# Altium PCB PCB1.PcbDoc (part 1 of 2)
Units mil, origin at the board's own origin, x right, y up, seen from the top; angles counter-clockwise.
Board outline 3937.01 x 2559.06 mil, 4 copper layers (Top Layer, GND, 3V3, Bottom Layer), stack 23.756 mil thick; 182 components, 90 nets, 545 pads, 228 vias.
Unrouted connection lines stored in the file: 5.
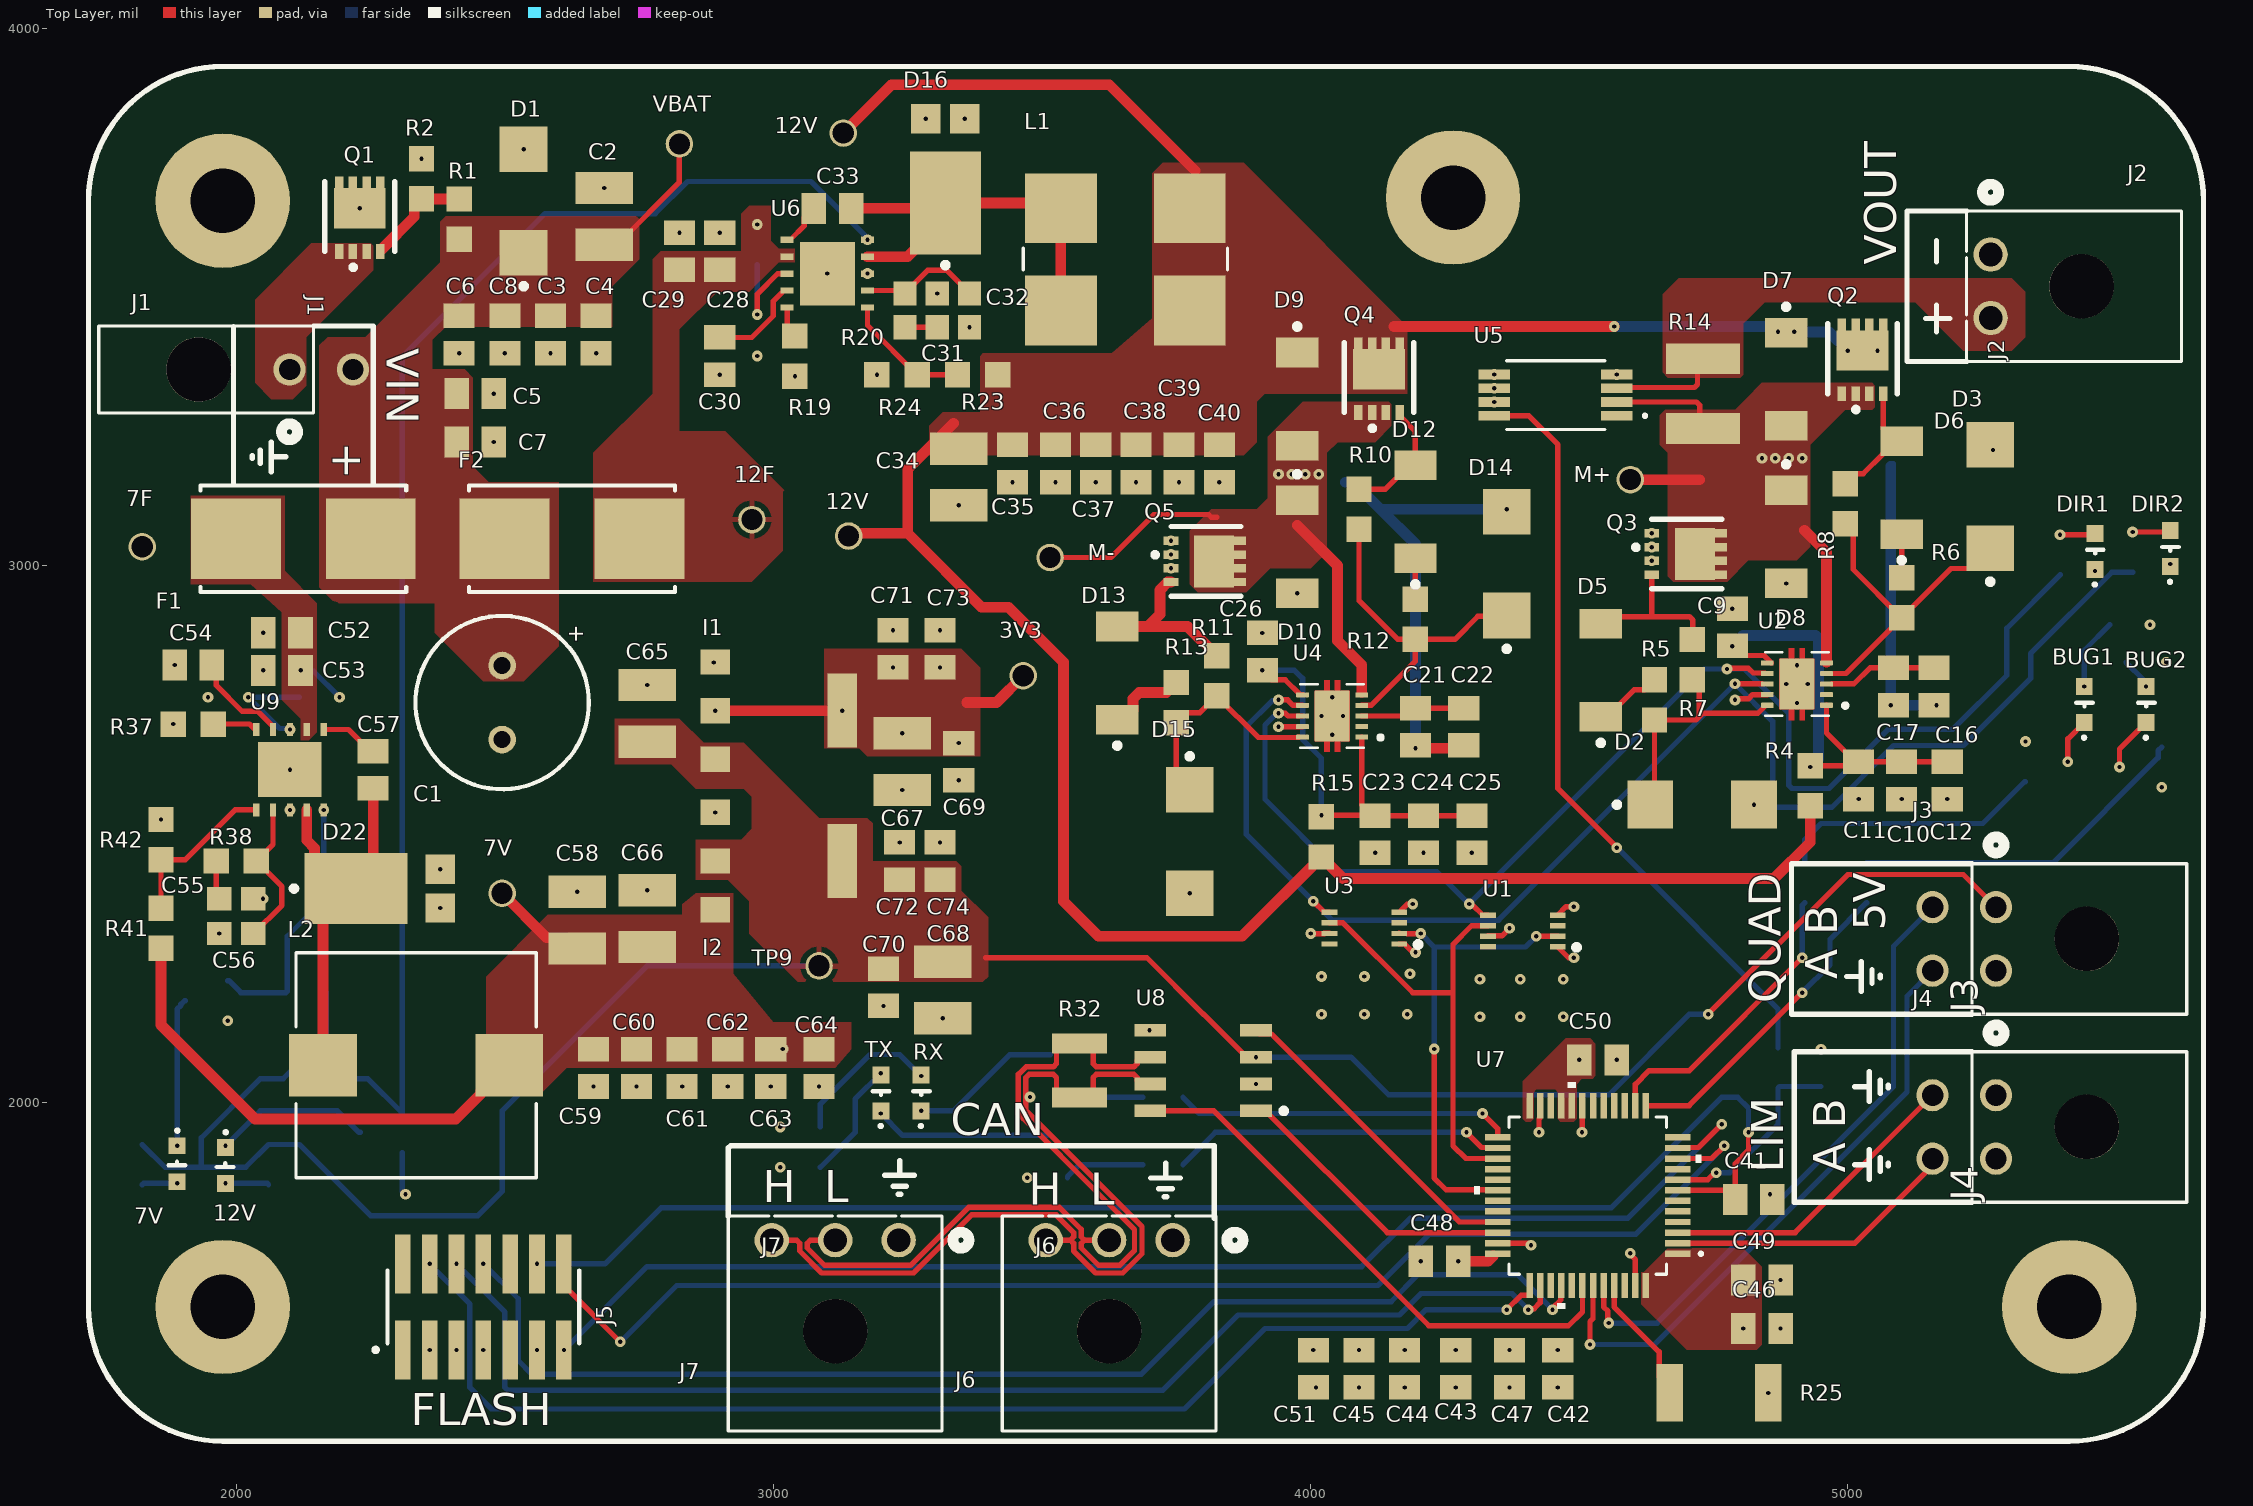
[diagram p0: Top Layer view]
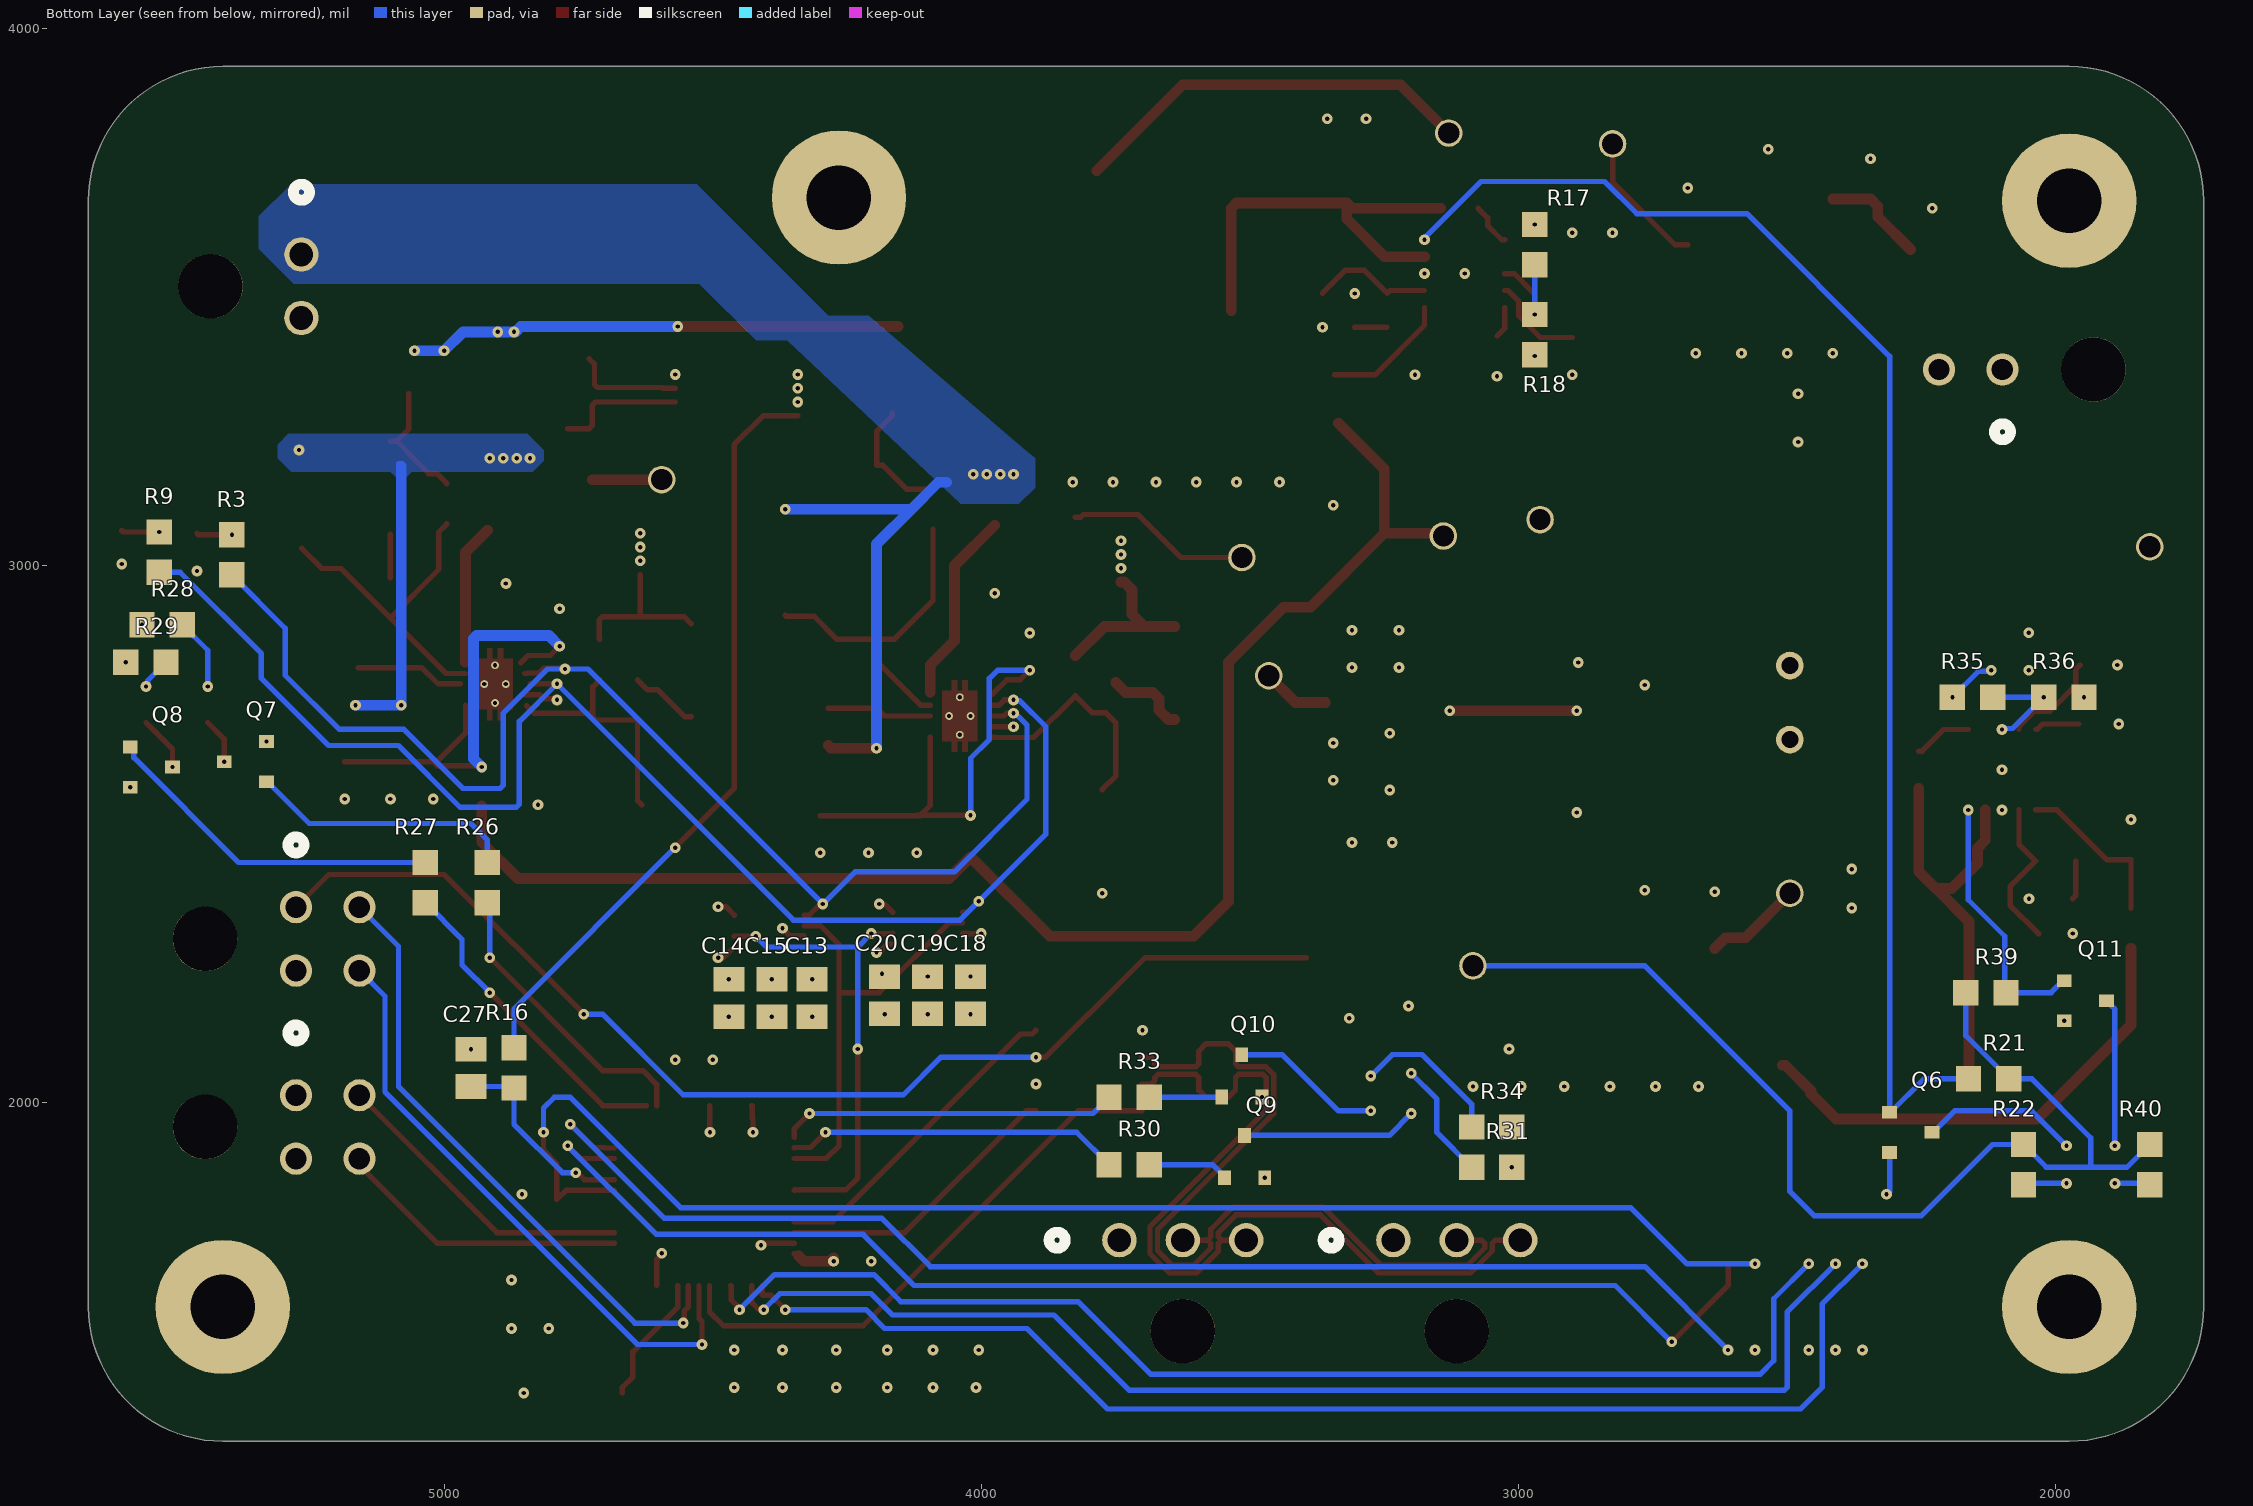
[diagram p1: Bottom Layer view, seen from below]
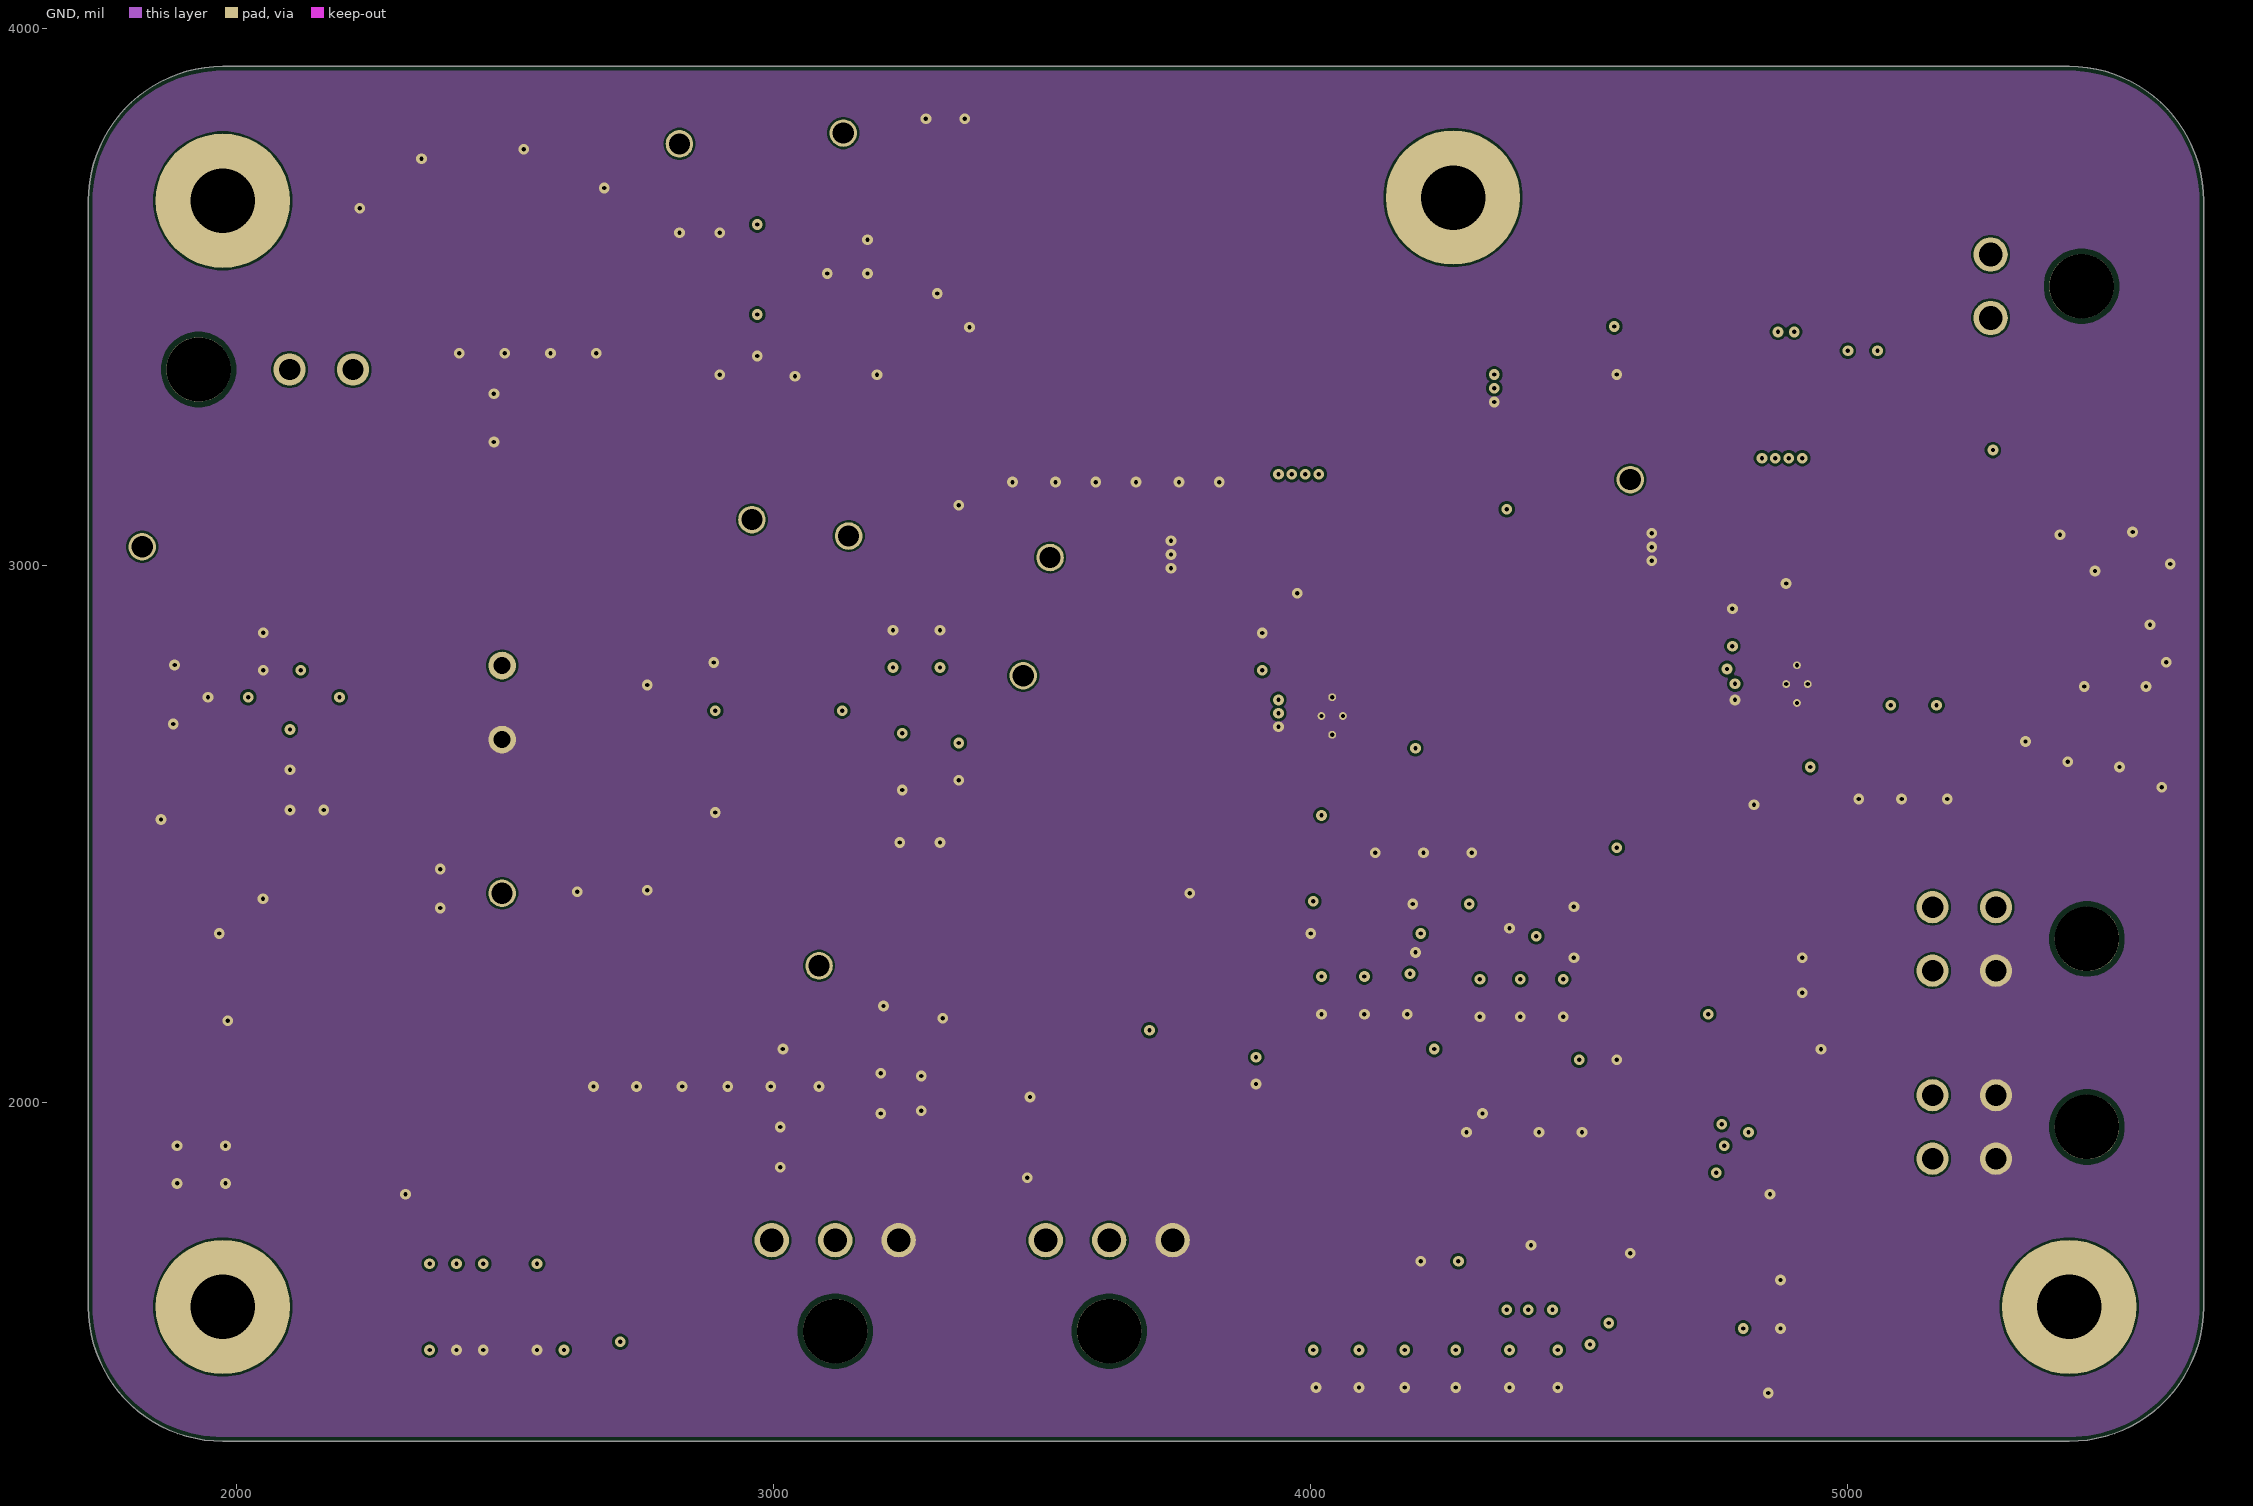
[diagram p2: GND]
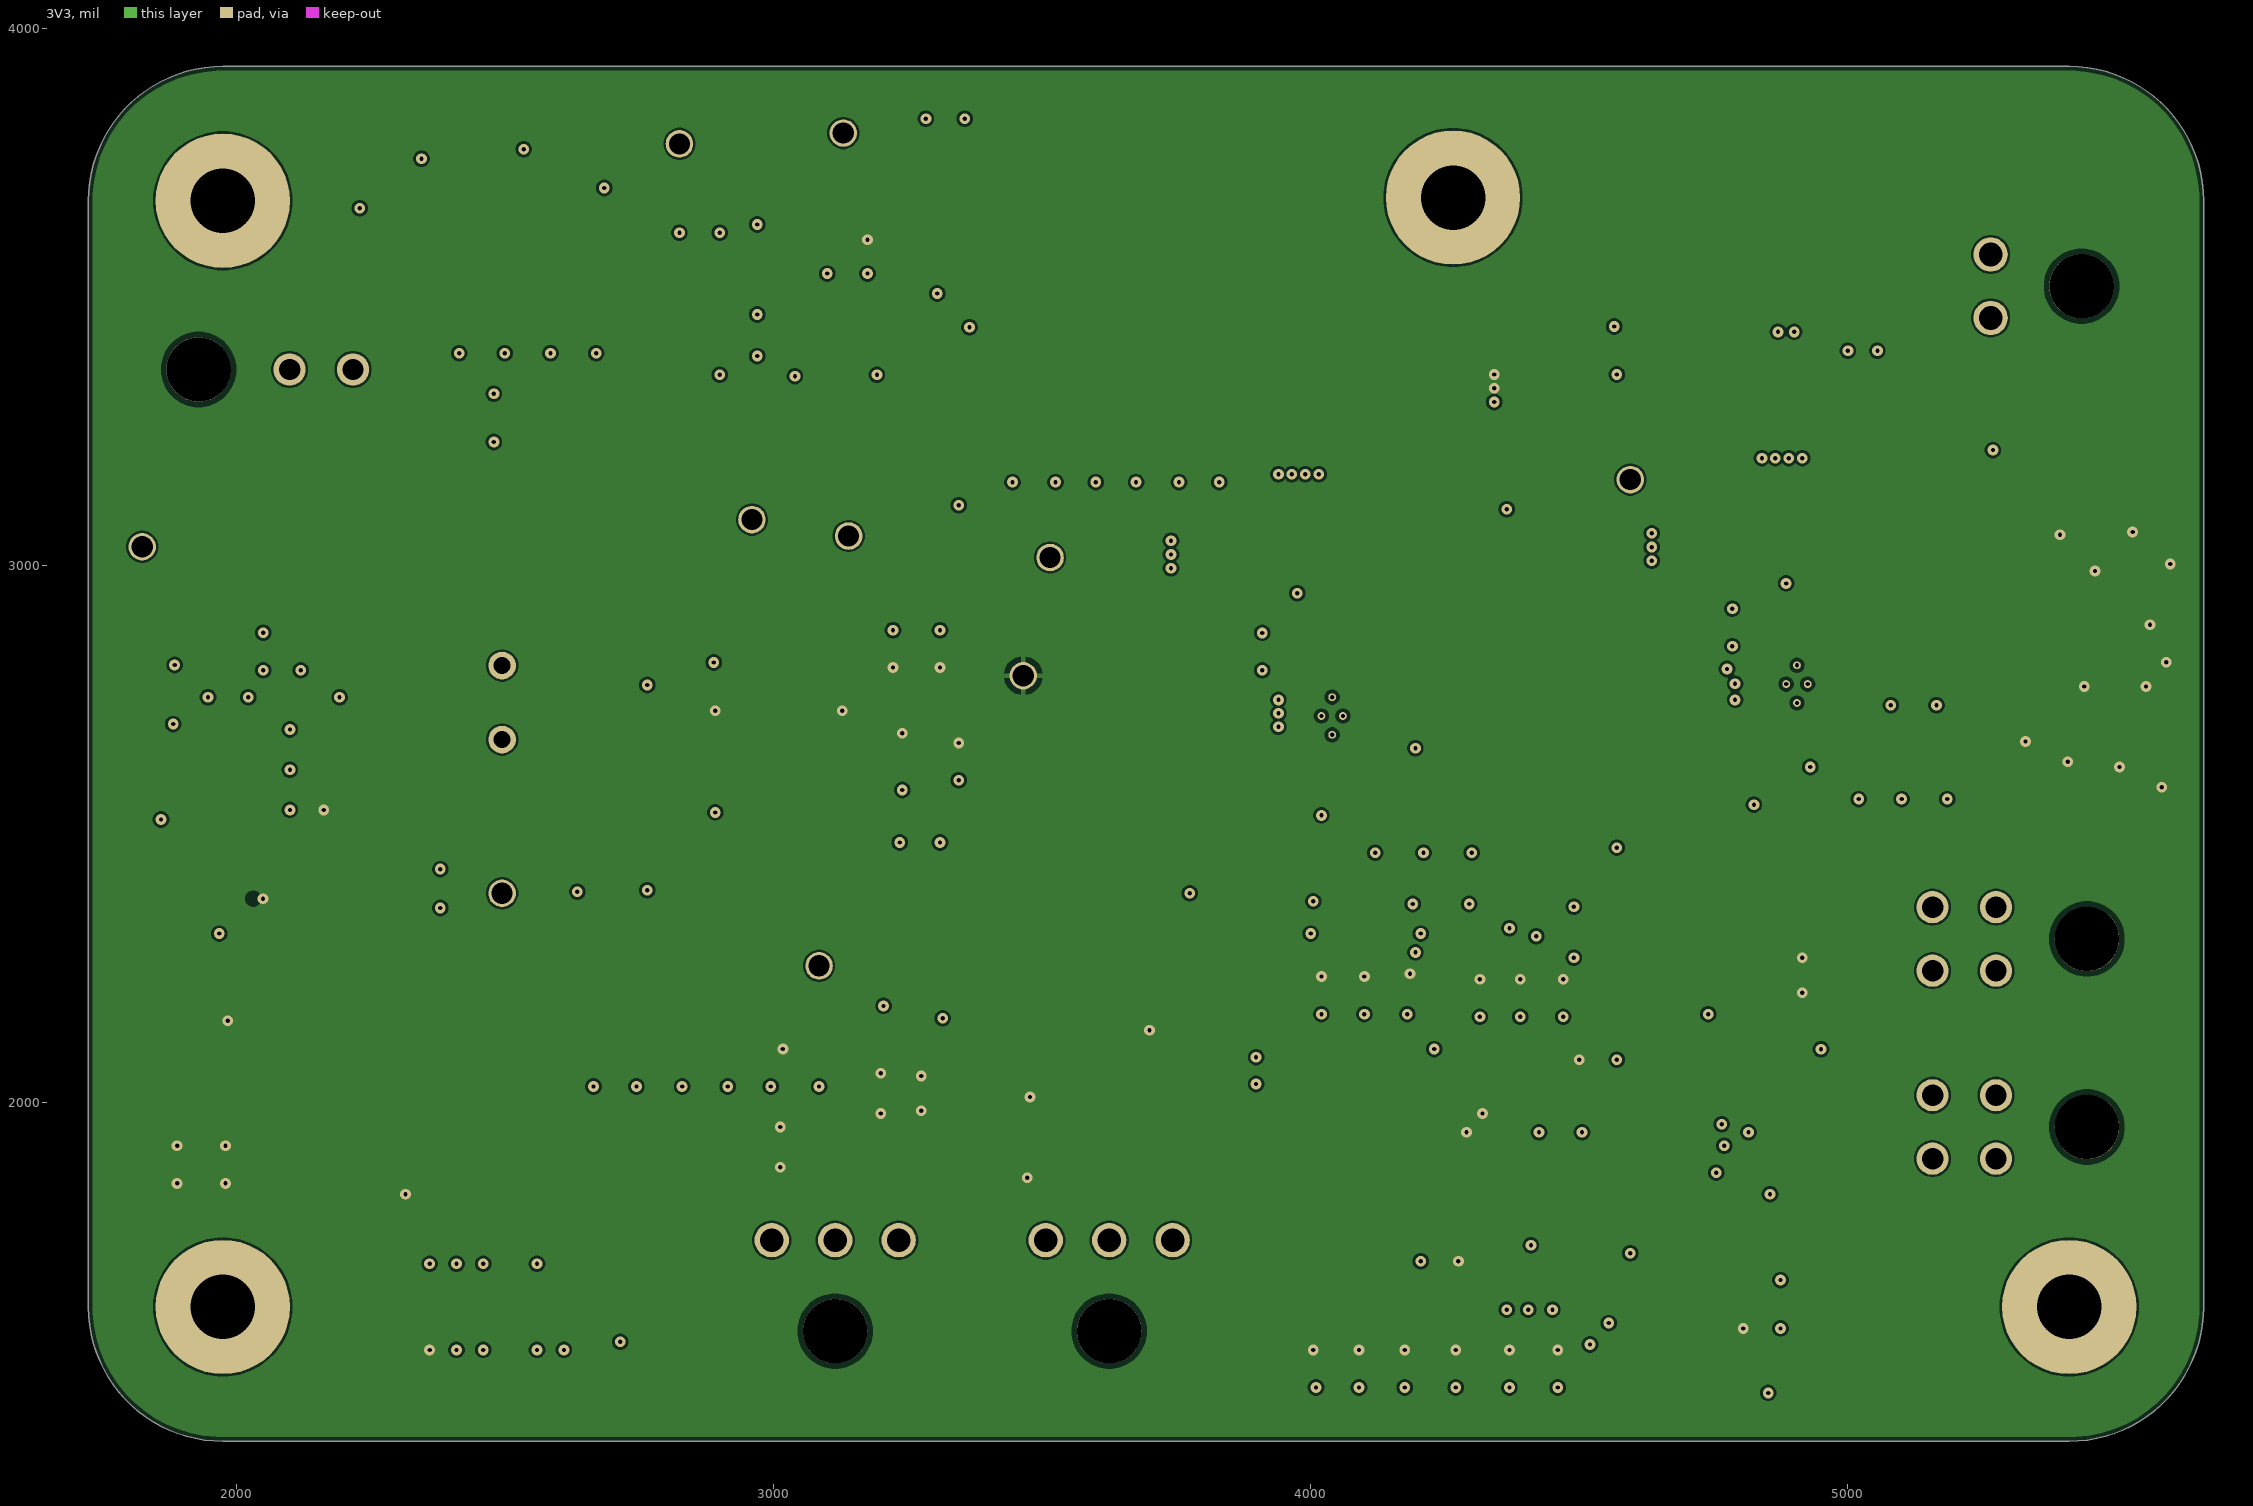
[diagram p3: 3V3]
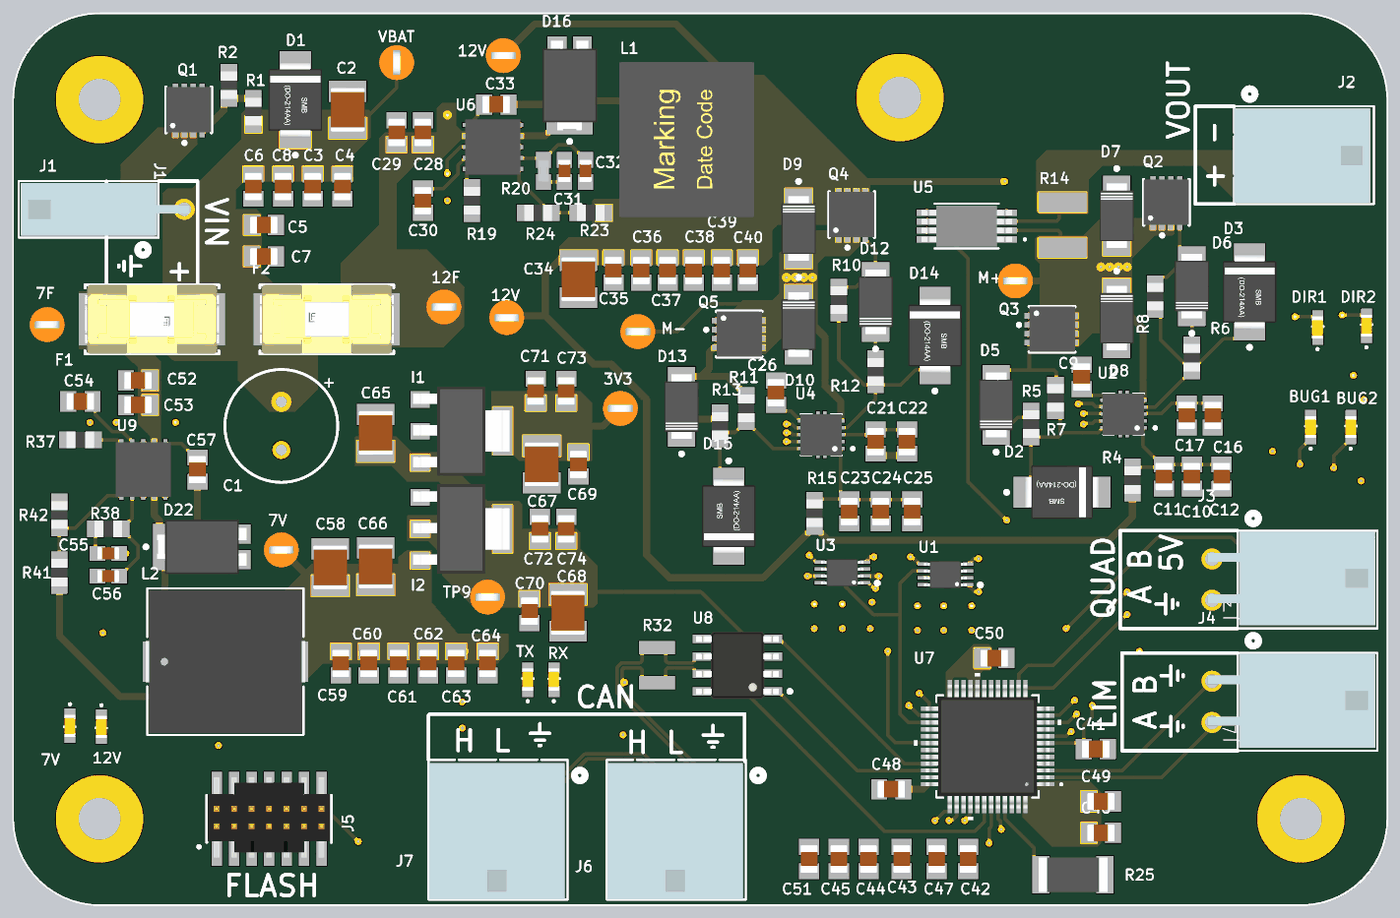
[diagram p5: 3D render of the assembled board from above, using the file's embedded part models]
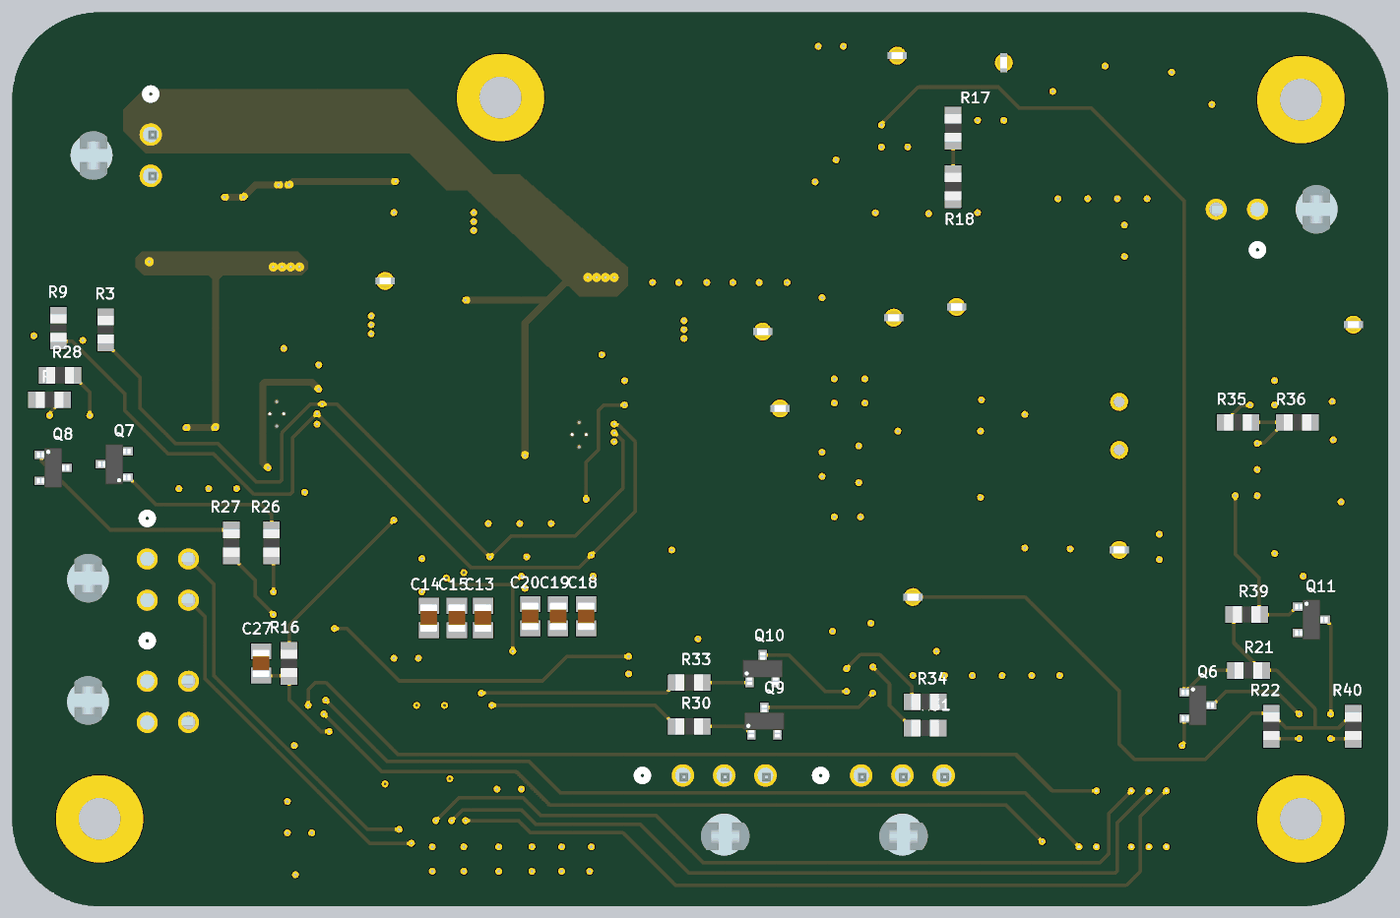
[diagram p6: 3D render of the assembled board from below, using the file's embedded part models]

## Layer stack, top to bottom
Top Solder: solder mask 0.4, Solder Resist, Dk 3.5
Top Layer: signal copper 1.4
Dielectric 2: prepreg 2.8, PP-006, Dk 4.1
GND: signal copper 1.378
Dielectric 1: dielectric 12.6, FR-4, Dk 4.8
3V3: signal copper 1.378
Dielectric 5: prepreg 2.8, PP-006, Dk 4.1
Bottom Layer: signal copper 1.4
Bottom Solder: solder mask 0.4, Solder Resist, Dk 3.5

## Board outline
1725,1620 1725,3679.06 cw(c1975,3679.06) 1975,3929.06 5412.01,3929.06 cw(c5412.01,3679.06) 5662.01,3679.06 5662.01,1620 cw(c5412.01,1620) 5412.01,1370 1975,1370 cw(c1975,1620)

## Design rules (kind name [scope] priority, off if disabled: settings)
BoardOutlineClearance [All] p1: gap=7.87 ignorepadtopadclearanceinfootprint=FALSE
Clearance [All] p1: gap=4 ignorepadtopadclearanceinfootprint=FALSE except(5: Arc-Via Track-Via SMDPad-Via THPad-Via Via-Via Via-Fill Via-Poly Via-Region Via-Text; 9.84: Arc-Hole Track-Hole SMDPad-Hole THPad-Hole Via-Hole Fill-Hole Poly-Hole Region-Hole Text-Hole)
ComponentClearance [All] p1: gap=4 collisioncheckmode=3 verticalgap=4 showdistances=TRUE
DiffPairsRouting [All] p1: maxlimit=4 minlimit=4 mostfreqgap=4 toplayer_minwidth=4 toplayer_maxwidth=71497.94 toplayer_prefwidth=4 midlayer1_minwidth=4 midlayer1_maxwidth=71497.94 midlayer1_prefwidth=4 midlayer2_minwidth=4 midlayer2_maxwidth=71497.94 midlayer2_prefwidth=4 bottomlayer_minwidth=4 bottomlayer_maxwidth=71497.94 bottomlayer_prefwidth=4 maxuncoupledlength=500
Height [All] p1: minheight=0 maxheight=71497.94 prefheight=500
HoleSize [All] p1: absolutevalues=TRUE maxlimit=248.03 minlimit=7.87 maxpercent=80.000 minpercent=20.000
HoleToHoleClearance [All] p1: gap=9.84 allowstackedmicrovias=FALSE
MinimumAnnularRing [All] p1: minimumring=3
MinimumSolderMaskSliver [All] p1: minsoldermaskwidth=0
PlaneClearance [All] p1: clearance=4
PlaneConnect PlaneConnectPowerPads [InPadClass('PowerPads')] p1: planeconnectstyle=Direct reliefexpansion=20 reliefentries=4 reliefconductorwidth=10 reliefairgap=10
PlaneConnect [All] p2: pad.planeconnectstyle=Relief pad.reliefexpansion=11.81 pad.reliefentries=4 pad.reliefconductorwidth=4 pad.reliefairgap=4 via.planeconnectstyle=Direct via.reliefexpansion=11.81 via.reliefentries=4 via.reliefconductorwidth=5 via.reliefairgap=5
PolygonConnect PolygonConnectPowerPads [All vs (InPadClass('PowerPads'))] p1: connectstyle=Direct reliefconductorwidth=10 reliefentries=4 polygonreliefangle="90 Angle" airgapwidth=10
PolygonConnect [All] p2: connectstyle=Direct reliefconductorwidth=4 reliefentries=4 polygonreliefangle="90 Angle" airgapwidth=4
RoutingVias [All] p1: holewidth=7.87 width=17.72 viastyle="Through Hole" minholewidth=7.87 minwidth=17.72 maxholewidth=248.03 maxwidth=257.87
SilkToSilkClearance [All] p1: silktosilkclearance=0
SilkToSolderMaskClearance [IsPad] p1: minsilkscreentomaskgap=4 clearancetoexposedcopper=TRUE
SolderMaskExpansion [All] p1: expansion=2.95 istentingtop=FALSE
SupplyNets "Schematic Supply Nets_10" [InNet('VDD')] p1: voltage=0.000
SupplyNets "Schematic Supply Nets_9" [InNet('VBAT_FUSED_12')] p2: voltage=0.000
SupplyNets "Schematic Supply Nets_8" [InNet('M+_beforeCURR')] p3: voltage=0.000
SupplyNets "Schematic Supply Nets_7" [InNet('VBAT_FUSED_7')] p4: voltage=0.000
SupplyNets "Schematic Supply Nets_6" [InNet('7V')] p5: voltage=0.000
SupplyNets "Schematic Supply Nets_5" [InNet('12V')] p6: voltage=0.000
SupplyNets "Schematic Supply Nets_3" [InNet('5V')] p7: voltage=0.000
SupplyNets "Schematic Supply Nets_2" [InNet('VBAT')] p8: voltage=0.000
SupplyNets "Schematic Supply Nets_1" [InNet('GND')] p9: voltage=0.000
SupplyNets "Schematic Supply Nets" [InNet('M+')] p10: voltage=0.000
Width [All] p1: maxlimit=71497.94 minlimit=4 preferedwidth=4
20 further rules are at their usual default settings.

## Classes and differential pairs
component class "Motor Control": 12V C9 C10 C11 C12 C13 C14 C15 C16 C17 C18 C19 C20 C21 C22 C23 C24 C25 C26 C27 D2 D3 D5 D6 D7 D8 D9 D10 D12 D13 D14 D15 DIR1 DIR2 J2 M+ M- Q2 Q3 Q4 Q5 R3 R4 R5 R6 R7 R8 R9 R10 R11 R12 R13 R14 R15 R16 U1 U2 U3 U4 U5
component class MCU: BUG1 BUG2 C41 C42 C43 C44 C45 C46 C47 C48 C49 C50 C51 J3 J4 J5 Q7 Q8 R25 R26 R27 R28 R29 U7
component class LDOs: 3V3 C65 C66 C67 C68 C69 C70 C71 C72 C73 C74 I1 I2 TP9
component class "Input Power": 7F 12F BUG1 C1 C2 C3 C4 C5 C6 C7 C8 F1 F2 J1 Q1 R1 R2 VBAT
component class CAN: J6 J7 Q9 Q10 R30 R31 R32 R33 R34 RX TX U8
component class "12V Buck": 12V C28 C29 C30 C31 C32 C33 C34 C35 C36 C37 C38 C39 C40 D16 L1 Q6 R17 R18 R19 R20 R21 R22 R23 R24 U6
component class "7V Buck": 7V C52 C53 C54 C55 C56 C57 C58 C59 C60 C61 C62 C63 C64 D22 L2 Q11 R35 R36 R37 R38 R39 R40 R41 R42 U9
differential pair CAN: +CAN_H -CAN_L

## Components (designator, comment, footprint, x,y, rotation, side; value= is the part's Value field where it differs from the comment)
3V3 "5003" TEST-POINT-0001 3465,2795 r0 top (schematic designator TP8)
7F "5003" TEST-POINT-0001 1825,3035 r0 top (schematic designator TP3)
7V "BL-HKC36G-AV-TRB" LED-0603 1860.42,1943.19 r270 top (schematic designator D23)
7V "5003" TEST-POINT-0001 2495,2390 r0 top (schematic designator TP7)
12F "5003" TEST-POINT-0001 2960,3085.51 r0 top (schematic designator TP2)
12V "BL-HKC36G-AV-TRB" LED-0603 1950.42,1940.19 r270 top (schematic designator D17)
12V "5003" TEST-POINT-0001 3140,3055 r0 top (schematic designator TP6)
12V "5003" TEST-POINT-0001 3130,3805 r0 top (schematic designator TP4)
BUG1 "BL-HKC36G-AV-TRB" LED-0603 5469.57,2684.8 r90 top (schematic designator D18)
BUG2 "BL-HKC36G-AV-TRB" LED-0603 5584.57,2684.8 r90 top (schematic designator D19)
C1 "CAP THRU" WCAP-ATUL_8X11.5(DXL) 2495,2745 r270 top value=100uF
C2 "CL32B106KMVNNWE" CAP-1210 2685,3650 r270 top
C3 "CC0805JKX7R9BB105" CAP-0805 2585,3430 r90 top
C4 "CL21B104KBCNNNC" CAP-0805 2670,3430 r90 top
C5 "C0805C103K5RACTU" CAP-0805 2445,3320 r180 top
C6 "CL21B102KBANNNC" CAP-0805 2415,3430 r90 top
C7 "CL21C101JBANNNC" CAP-0805 2445,3230 r180 top
C8 "CL21C100CBANNNC" CAP-0805 2500,3430 r90 top
C9 "CL21B102KBANNNC" CAP-0805 4785,2885 r270 top
C10 "CC0805JKX7R9BB105" CAP-0805 5100,2600 r270 top
C11 "C0805C103K5RACTU" CAP-0805 5020,2600 r270 top
C12 "CL21B102KBANNNC" CAP-0805 5185,2600 r270 top
C13 "CC0805JKX7R9BB105" CAP-0805 4315,2195 r270 bottom
C14 "CL21B104KBCNNNC" CAP-0805 4470,2195 r270 bottom
C15 "CL21B102KBANNNC" CAP-0805 4390,2195 r270 bottom
C16 "CL21B102KBANNNC" CAP-0805 5160,2775 r270 top
C17 "CL21B104KBCNNNC" CAP-0805 5085,2775 r270 top
C18 "CC0805JKX7R9BB105" CAP-0805 4020,2200 r270 bottom
C19 "CL21B104KBCNNNC" CAP-0805 4100,2200 r270 bottom
C20 "CL21B102KBANNNC" CAP-0805 4180,2200 r270 bottom
C21 "CL21B104KBCNNNC" CAP-0805 4195,2700 r270 top
C22 "CL21B102KBANNNC" CAP-0805 4285,2700 r270 top
C23 "CL21B102KBANNNC" CAP-0805 4120,2500 r270 top
C24 "C0805C103K5RACTU" CAP-0805 4210,2500 r270 top
C25 "CC0805JKX7R9BB105" CAP-0805 4300,2500 r270 top
C26 "CL21B102KBANNNC" CAP-0805 3910,2840 r270 top
C27 "CL21B102KBANNNC" CAP-0805 4950,2065 r270 bottom
C28 "CL21A225KBFNNNE" CAP-0805 2900,3585 r270 top
C29 "CL21A225KBFNNNE" CAP-0805 2825,3585 r270 top
C30 "CAP 0805" CAP-0805 2900,3390 r90 top
C31 "GRM1885C1H511JA01D" CAP-0603 3305,3475 r270 top
C32 "CL10C6R8CB8NNNC" CAP-0603 3365,3475 r90 top
C33 "CL21B104KBCNNNC" CAP-0805 3110,3665 r180 top
C34 "CL32B106KMVNNWE" CAP-1210 3345,3165 r90 top
C35 "CC0805JKX7R9BB105" CAP-0805 3445,3190 r90 top
C36 "CL21B104KBCNNNC" CAP-0805 3525,3190 r90 top
C37 "C0805C103K5RACTU" CAP-0805 3600,3190 r90 top
C38 "CL21B102KBANNNC" CAP-0805 3675,3190 r90 top
C39 "CL21C101JBANNNC" CAP-0805 3755,3190 r90 top
C40 "CL21C100CBANNNC" CAP-0805 3830,3190 r90 top
C41 "CL21B104KBCNNNC" CAP-0805 4825,1820 r0 top
C42 "CL21B104KBCNNNC" CAP-0805 4460,1505 r90 top
C43 "CAP 0805" CAP-0805 4270,1505 r90 top
C44 "TMK212AB7475KG-T" CAP-0805 4175,1505 r90 top
C45 "CC0805JKX7R9BB105" CAP-0805 4090,1505 r90 top
C46 "CL21B104KBCNNNC" CAP-0805 4840,1580 r180 top
C47 "CC0805JKX7R9BB105" CAP-0805 4370,1505 r90 top
C48 "CL21B104KBCNNNC" CAP-0805 4240,1705 r0 top
C49 "CL21B104KBCNNNC" CAP-0805 4840,1670 r180 top
C50 "CL21B104KBCNNNC" CAP-0805 4535,2080 r180 top
C51 "TMK212AB7475KG-T" CAP-0805 4005,1505 r90 top
C52 "CAP 0805" CAP-0805 2085,2875 r0 top
C53 "CAP 0805" CAP-0805 2085,2805 r0 top
C54 "CAP 0805" CAP-0805 1920,2815 r0 top
C55 "GCM1885C1H302FA16J" CAP-0603 2000,2380 r180 top
C56 "CL10C6R8CB8NNNC" CAP-0603 2000,2315 r0 top
C57 "CL21B104KBCNNNC" CAP-0805 2255,2620 r90 top
C58 "CL32B106KMVNNWE" CAP-1210 2635,2340 r270 top
C59 "CC0805JKX7R9BB105" CAP-0805 2665,2065 r90 top
C60 "CL21B104KBCNNNC" CAP-0805 2745,2065 r90 top
C61 "C0805C103K5RACTU" CAP-0805 2830,2065 r90 top
C62 "CL21B102KBANNNC" CAP-0805 2915,2065 r90 top
C63 "CL21C101JBANNNC" CAP-0805 2995,2065 r90 top
C64 "CL21C100CBANNNC" CAP-0805 3085,2065 r90 top
C65 "CL32B106KMVNNWE" CAP-1210 2765,2725 r270 top
C66 "CL32B106KMVNNWE" CAP-1210 2765,2342.8 r270 top
C67 "CL32B106KMVNNWE" CAP-1210 3240,2635 r90 top
C68 "CL32B106KMVNNWE" CAP-1210 3315,2210 r90 top
C69 "CL21B104KBCNNNC" CAP-0805 3345,2635 r90 top
C70 "CL21B104KBCNNNC" CAP-0805 3205,2215 r90 top
C71 "C0805C471K5RACTU" CAP-0805 3222.5,2845 r270 top
C72 "C0805C471K5RACTU" CAP-0805 3235,2450 r270 top
C73 "CC0805JKX7R9BB105" CAP-0805 3310,2845 r270 top
C74 "CC0805JKX7R9BB105" CAP-0805 3310,2450 r270 top
D1 "SMBJ40CA" "DO-214AA (SMBJ)" 2535,3680 r270 top
D2 "SMBJ40CA" "DO-214AA (SMBJ)" 4730,2555 r180 top
D3 "SMBJ40CA" "DO-214AA (SMBJ)" 5265,3130 r270 top
D5 "PMEG6030EP,115" DIO-SOD128 4540,2805 r0 top
D6 "PMEG6030EP,115" DIO-SOD128 5100,3145 r0 top
D7 "PMEG6030EP,115" DIO-SOD128 4885,3346.61 r180 top
D8 "PMEG6030EP,115" DIO-SOD128 4885,3053.39 r180 top
D9 "PMEG6030EP,115" DIO-SOD128 3975,3310 r180 top
D10 "PMEG6030EP,115" DIO-SOD128 3975,3035 r180 top
D12 "PMEG6030EP,115" DIO-SOD128 4195,3100 r0 top
D13 "PMEG6030EP,115" DIO-SOD128 3640,2800 r0 top
D14 "SMBJ40CA" "DO-214AA (SMBJ)" 4365,3005 r270 top
D15 "SMBJ40CA" "DO-214AA (SMBJ)" 3775,2485 r90 top
D16 "PDS760-13" DO-POWERDI5 3320,3719.33 r270 top
D22 "PDS760-13" DO-POWERDI5 2267.56,2398.78 r180 top
DIR1 "BL-HKC36G-AV-TRB" LED-0603 5489.57,2969.8 r90 top (schematic designator D4)
DIR2 "BL-HKC36G-AV-TRB" LED-0603 5629.57,2974.8 r90 top (schematic designator D11)
F1 "01550900M" FUSE-0001 2125,3050 r180 top
F2 "01550900M" FUSE-0001 2625,3050 r0 top
I1 "LM1117IMPX-3.3/NOPB" IC-SOT-223-4 3010,2730 r0 top
I2 "LM1117MPX-5.0/NOPB" IC-SOT-223-4 3010,2450 r0 top
J1 "2125280200" CONN_2125280000_02_MOL 2099.29,3365 r270 top
J2 "2157602002" CONN_2157600003-SD_02_PEG_MOL 5265.71,3579.06 r90 top
J3 "2125280400" CONN_2125280000_04_MOL 5275.71,2364.06 r90 top
J4 "2125280400" CONN_2125280000_04_MOL 5275.71,2014.06 r90 top
J5 "FTSH-107-01-L-DV-K" SAMTEC_FTSH-107-01-L-DV-K 2460,1620.12 r0 top
J6 "2157601003" CONN_2157600003-SD_03_PEG_MOL 3743.11,1744.29 r0 top
J7 "2157601003" CONN_2157600003-SD_03_PEG_MOL 3233.11,1744.29 r0 top
L1 "CSAD1010-150M" IND-15U-0002 3835,3350 r90 top
L2 "BMRF001010401R0MD1" IND-10UH-0001 2335,2070 r0 top
M+ "5003" TEST-POINT-0001 4595,3160 r0 top (schematic designator M+1)
M- "5003" TEST-POINT-0001 3515,3015 r0 top (schematic designator M+2)
Q1 "CSD18543Q3AT" IC-8VSONCLIP 2157.68,3550.16 r0 top
Q2 "CSD17575Q3" IC-8VSONCLIP 4954.88,3285.47 r0 top
Q3 "CSD17575Q3" IC-8VSONCLIP 4600.47,3093.93 r270 top
Q4 "CSD17575Q3" IC-8VSONCLIP 4054.88,3250.47 r0 top
Q5 "CSD17575Q3" IC-8VSONCLIP 3705.47,3080.12 r270 top
Q6 "T2N7002AK,LM" IC-SOT23-3 2270,1945 r270 bottom
Q7 "T2N7002AK,LM" IC-SOT23-3 5370,2635 r90 bottom
Q8 "T2N7002AK,LM" IC-SOT23-3 5545,2625 r270 bottom
Q9 "T2N7002AK,LM" IC-SOT23-3 3510,1900 r180 bottom
Q10 "T2N7002AK,LM" IC-SOT23-3 3515,2050 r180 bottom
Q11 "T2N7002AK,LM" IC-SOT23-3 1945,2190 r270 bottom
R1 "RC0805FR-07200KL" RES-0805 2415,3645 r90 top
R2 "ERA-6AEB104V" RES-0805 2345,3720 r90 top
R3 "RC0805FR-07100RL" RES-0805 5395,3020 r90 bottom
R4 "RMCF0805JT1R00" RES-0805 4930,2590 r270 top
R5 "RC0805FR-0733RL" RES-0805 4640,2750 r90 top
R6 "RC0805FR-0733RL" RES-0805 5100,2940 r90 top
R7 "RC0805FR-0733RL" RES-0805 4710,2825 r90 top
R8 "RC0805FR-0733RL" RES-0805 4995,3115 r90 top
R9 "RC0805FR-07100RL" RES-0805 5530,3025 r90 bottom
R10 "RC0805FR-0733RL" RES-0805 4090,3105 r90 top
R11 "RC0805FR-0733RL" RES-0805 3825,2795 r90 top
R12 "RC0805FR-0733RL" RES-0805 4195,2900 r90 top
R13 "RC0805FR-0733RL" RES-0805 3750,2745 r90 top
R14 "RES 2512" RES-2512 4730,3320 r90 top
R15 "RMCF0805JT1R00" RES-0805 4020,2495 r270 top
R16 "RC0805FR-07100RL" RES-0805 4870,2065 r270 bottom
R17 "CRCW08052M15FKEA" RES-0805 2970,3597.6 r90 bottom
R18 "ERA-6AEB104V" RES-0805 2970,3430 r90 bottom
R19 "RC0805FR-07178KL" RES-0805 3040,3390 r90 top
R20 "RC0603FR-0759KL" RES-0603 3245,3475 r90 top
R21 "CRCW08051K00FKEA" RES-0805 2125,2045 r180 bottom
R22 "ERJ-6GEYJ241V" RES-0805 2060,1885 r90 bottom
R23 "RC0805FR-07147KL" RES-0805 3380,3355 r0 top
R24 "RC0805FR-0710K5L" RES-0805 3230,3355 r0 top
R25 "CRF2010-J/-000ELF" RES-2010 4760,1460 r180 top
R26 "CRGCQ0805J470R" RES-0805 4920,2410 r90 bottom
R27 "CRGCQ0805J470R" RES-0805 5035,2410 r90 bottom
R28 "RC0805FR-07100RL" RES-0805 5525,2890 r0 bottom
R29 "RC0805FR-07100RL" RES-0805 5555,2820 r0 bottom
R30 "CRGCQ0805J470R" RES-0805 3725,1885 r180 bottom
R31 "RC0805FR-07100RL" RES-0805 3050,1880 r180 bottom
R32 "RC1210FR-07120RL" RES-1210 3570,2060 r270 top
R33 "CRGCQ0805J470R" RES-0805 3725,2010 r180 bottom
R34 "RC0805FR-07100RL" RES-0805 3050,1955 r180 bottom
R35 "CRCW08052M15FKEA" RES-0805 2155,2755 r0 bottom
R36 "ERA-6AEB104V" RES-0805 1985,2755 r0 bottom
R37 "RC0805FR-07178KL" RES-0805 1920,2705 r0 top
R38 "RC0805FR-0736K5L" RES-0805 2000,2450 r0 top
R39 "CRCW08051K00FKEA" RES-0805 2130,2205 r0 bottom
R40 "ERJ-6GEYJ241V" RES-0805 1825,1885 r90 bottom
R41 "CRCW080580K6FKEA" RES-0805 1860,2325 r270 top
R42 "RT0805BRD0710K4L" RES-0805 1860,2490 r270 top
RX "BL-HKC36G-AV-TRB" LED-0603 3304.57,1961.81 r90 top (schematic designator D21)
TP9 "5003" TEST-POINT-0001 3085,2255 r0 top
TX "BL-HKC36G-AV-TRB" LED-0603 3229.57,1961.81 r90 top (schematic designator D20)
U1 "SN74LVC2G157DCUR" IC-8VSSOP 4459.92,2349.37 r180 top
U2 "UCC27282DRCR" IC-10VSON 4905.12,2779.37 r180 top
U3 "SN74LVC2G157DCUR" IC-8VSSOP 4165,2354.68 r180 top
U4 "UCC27282DRCR" IC-10VSON 4040,2720 r180 top
U5 "INA240A2PWR" PW0008A_L 4455.83,3317.2 r180 top
U6 "TPS54561DPRR" IC-10WSON 3100.2,3543.5 r0 top
U7 "STM32G431CBT6" IC-LQFP48 4515.79,1827.32 r180 top
U8 "TCAN1044VDRQ1" IC-8SOIC 3800,2060 r90 top
U9 "TPS54561DPRR" IC-10WSON 2100,2620 r270 top
VBAT "5003" TEST-POINT-0001 2825,3785 r90 top (schematic designator TP1)

## Footprints (in the part's own frame and the unit in brackets; to place one, negate y for a bottom-side part, rotate by r counter-clockwise, add the part's x,y. Pads: shape width x height; smd on the part's side, far side on the other; paste and mask are expansions set on the pad)
CAP-0603 [mm]
  rect 1.15x1.1 smd: 1(-0.8,0) 2(0.8,0)
  body extent -0.8,-0.45 0.8,0.45, height 0.8
CAP-0805 [mm]
  rect 1.16x1.47 smd: 1(-0.88,0) 2(0.88,0)
  body extent -1,-0.63 1,0.63, height 0.94
CAP-1210 [mm]
  rect 1.53x2.72 smd: 1(-1.341,0) 2(1.341,0)
  body extent -1.6,-1.25 1.6,1.25, height 2.7
CONN_2125280000_02_MOL [mil]
  round 60 hole 40 paste-99999 mask+0: 1(0,0) 2(0,118.11)
  round 120 hole 120 unplated paste-99999 mask+0: 3(0,-169.29)
  silkscreen extent -81,-355 131,45, body extent -76,-350 76,131, height 325
CONN_2125280000_04_MOL [mil]
  round 60 hole 40 paste-99999 mask+0: 1(0,0) 2(-118.11,0) 3(0,118.11) 4(-118.11,118.11)
  round 120 hole 120 unplated paste-99999 mask+0: 5(-59.06,-169.29)
  silkscreen extent -199,-355 131,45, body extent -190,-350 80,131, height 325
CONN_2157600003-SD_02_PEG_MOL [mil]
  round 64 hole 44 paste-99999 mask+0: 1(0,0) 2(-118.11,0)
  round 120 hole 120 unplated paste-99999 mask+0: 3(-59.06,-169.29)
  silkscreen extent -199,-355 131,45, body extent -195,-345 75,45, height 210
CONN_2157600003-SD_03_PEG_MOL [mil]
  round 64 hole 44 paste-99999 mask+0: 1(0,0) 2(-118.11,0) 3(-236.22,0)
  round 120 hole 120 unplated paste-99999 mask+0: 4(-118.11,-169.29)
  silkscreen extent -317,-355 131,45, body extent -315,-355 73,35, height 210
DIO-SOD128 [mm]
  rect 2x1.4 smd: 1(0,2.2) 2(0,-2.2)
  silkscreen extent -0.12,-3.55 0.13,-3.3, body extent -1.25,-2.35 1.25,2.35, height 1.05
"DO-214AA (SMBJ)" [mm]
  rect 2.16x2.26 smd: 1(-2.416,0) 2(2.484,0)
  silkscreen extent 3.94,-0.12 4.19,0.13, body extent -2.72,-1.95 2.78,1.95, height 2.45
DO-POWERDI5 [mm] "SMD, 3-Leads, Body 3.975x5.375mm, Pitch 1.84mm"
  rect 1.4x1.39 smd: 1(-2.856,-0.92) 1(-2.856,0.92)
  rect 4.86x3.36 smd: 2(1.126,0)
  silkscreen extent 3.94,-0.12 4.19,0.13, body extent -3.25,-1.98 3.25,1.98, height 1.15
FUSE-0001 [mil]
  rect 167x150 smd paste+0 mask+0: 1(-125.5,0) 2(125.5,0)
  silkscreen extent -192,-99 192,99, body extent -213,-103 213,103, height 10
IC-8SOIC [mm]
  rect 0.6x1.5 smd: 1(-1.905,-2.5) 2(-0.635,-2.5) 3(0.635,-2.5) 4(1.905,-2.5) 5(1.905,2.5) 6(0.635,2.5) 7(-0.635,2.5) 8(-1.905,2.5)
  silkscreen extent -2.03,-3.94 -1.78,-3.69, body extent -2.45,-3 2.45,3, height 1.75
IC-8VSONCLIP [mm]
  rect 0.4x0.7 smd paste-100 mask+0.05: 1(2.812,0.877) 2(0.862,0.877) 2(1.512,0.877) 2(2.162,0.877) 3(0.862,4.077) 3(1.512,4.077) 3(2.162,4.077) 3(2.812,4.077)
  rect 2.45x1.9 smd paste-100 mask+0.05: 3(1.837,2.917)
  silkscreen extent 0.19,0.03 3.49,4.18, body extent 0.18,0.89 3.48,4.19, height 1.1
IC-8VSSOP [mm]
  rect 0.75x0.25 smd: 1(0,1.5) 2(0,1) 3(0,0.5) 4(0,0) 5(3.3,0) 6(3.3,0.5) 7(3.3,1) 8(3.3,1.5)
  silkscreen extent -1.02,1.4 -0.76,1.65, body extent 0.1,-0.24 3.2,1.76, height 0.9
IC-10VSON [mm]
  rrect25% 0.6x0.24 smd mask+0: 1(-1.4,1) 2(-1.4,0.5) 3(-1.4,0) 4(-1.4,-0.5) 5(-1.4,-1) 6(1.4,-1) 7(1.4,-0.5) 8(1.4,0) 9(1.4,0.5) 10(1.4,1)
  round 0.368 hole 0.2 mask+0: 11(-0.508,0) 11(0,0.889) 11(0,-0.889) 11(0.508,0)
  rrect5% 1.65x2.4 smd paste-2 mask+0: 11(0,0)
  Top Layer region: 0.375,1.2 0.825,1.2 0.825,-1.2 0.375,-1.2 0.375,-1.7 0.125,-1.7 0.125,-1.2 -0.125,-1.2 -0.125,-1.7 -0.375,-1.7 -0.375,-1.2 -0.825,-1.2 -0.825,1.2 -0.375,1.2 -0.375,1.7 -0.125,1.7 -0.125,1.2 0.125,1.2 0.125,1.7 0.375,1.7
  silkscreen extent -2.39,-1.5 1.5,1.5, body extent -1.48,-1.48 1.52,1.52, height 1
IC-10WSON [mm]
  rect 0.6x0.3 smd: 1(-1.9,1.6) 2(-1.9,0.8) 3(-1.9,0) 4(-1.9,-0.8) 5(-1.9,-1.6) 6(1.9,-1.6) 7(1.9,-0.8) 8(1.9,0) 9(1.9,0.8) 10(1.9,1.6)
  rect 2.6x3 smd: 11(0,0)
  body extent -2,-2 2,2, height 0.8
IC-LQFP48 [mil]
  rect 47x12 smd paste+0 mask+0: 1(-167.32,108.27) 2(-167.32,88.58) 3(-167.32,68.9) 4(-167.32,49.21) 5(-167.32,29.53) 6(-167.32,9.84) 7(-167.32,-9.84) 8(-167.32,-29.53) 9(-167.32,-49.21) 10(-167.32,-68.9) 11(-167.32,-88.58) 12(-167.32,-108.27) 25(167.32,-108.27) 26(167.32,-88.58) 27(167.32,-68.9) 28(167.32,-49.21) 29(167.32,-29.53) 30(167.32,-9.84) 31(167.32,9.84) 32(167.32,29.53) 33(167.32,49.21) 34(167.32,68.9) 35(167.32,88.58) 36(167.32,108.27)
  rect 12x47 smd paste+0 mask+0: 13(-108.27,-167.32) 14(-88.58,-167.32) 15(-68.9,-167.32) 16(-49.21,-167.32) 17(-29.53,-167.32) 18(-9.84,-167.32) 19(9.84,-167.32) 20(29.53,-167.32) 21(49.21,-167.32) 22(68.9,-167.32) 23(88.58,-167.32) 24(108.27,-167.32) 37(108.27,167.32) 38(88.58,167.32) 39(68.9,167.32) 40(49.21,167.32) 41(29.53,167.32) 42(9.84,167.32) 43(-9.84,167.32) 44(-29.53,167.32) 45(-49.21,167.32) 46(-68.9,167.32) 47(-88.58,167.32) 48(-108.27,167.32)
  silkscreen extent -214,-211 211,211, body extent -177,-177 177,177, height 63
IC-SOT23-3 [mm]
  rect 0.6x0.7 smd: 1(-0.95,-1) 2(0.95,-1) 3(0,1)
  body extent -1.46,-1.18 1.46,1.18, height 1.12
IC-SOT-223-4 [mm]
  rect 1.4x1.2 smd mask+0.07: 1(-3,2.3) 3(-3,-2.3) 4(-3,0)
  rect 1.4x3.5 smd: 2(3,0)
  body extent -3.5,-3.25 3.5,3.25, height 1.68
IND-10UH-0001 [mil]
  rect 126x116 smd paste+0 mask+0: 1(-173.5,0) 2(173.5,0)
  silkscreen extent -224,-210 224,210, body extent -229,-204 229,204, height 157
IND-15U-0002 [mm] "12V Buck"
  rect 3.3x3.4 smd paste+0 mask+0: 1(3.175,7.62) 1(8.001,7.62) 2(3.175,1.524) 2(8.001,1.524)
  silkscreen extent 5.08,-0.25 6.11,9.4, body extent -0.19,-0.33 11.11,9.47, height 10.79
LED-0603 [mm]
  rect 0.8x0.8 smd: 1(2.291,0.751) 2(0.589,0.751)
  silkscreen extent -0.2,0.34 1.52,1.13, body extent 0.65,0.36 2.25,1.16, height 0.39
PW0008A_L [mil]
  rect 59x18 smd paste+0 mask+2: 1(-114.17,38.39) 2(-114.17,12.8) 3(-114.17,-12.8) 4(-114.17,-38.39) 5(114.17,-38.39) 6(114.17,-12.8) 7(114.17,12.8) 8(114.17,38.39)
  silkscreen extent -169,-64 92,64, body extent -130,-59 130,59, height 47
RES-0603 [mm]
  rect 1.15x1.1 smd: 1(-0.8,0) 2(0.8,0)
  body extent -0.8,-0.4 0.8,0.4, height 0.43
RES-0805 [mm]
  rect 1.2x1.2 smd: 1(-0.95,0) 2(0.95,0)
  body extent -1,-0.6 1,0.6, height 0.71
RES-1210 [mm] "Chip Resistor, 2-Leads, Body 3.10x2.60mm, IPC High Density"
  rect 0.95x2.6 smd: 1(-1.275,0) 2(1.275,0)
  body extent -1.6,-1.35 1.6,1.35, height 0.6
RES-2010 [mm]
  rect 1.26x2.72 smd: 1(-2.325,0) 2(2.325,0)
  body extent -2.5,-1.25 2.5,1.25, height 0.7
RES-2512 [mm]
  rect 1.45x3.5 smd: 1(-1.65,0) 2(1.65,0)
SAMTEC_FTSH-107-01-L-DV-K [mm]
  rect 0.74x2.79 smd: 01(-3.81,-2.035) 02(-3.81,2.035) 03(-2.54,-2.035) 04(-2.54,2.035) 05(-1.27,-2.035) 06(-1.27,2.035) 07(0,-2.035) 08(0,2.035) 09(1.27,-2.035) 10(1.27,2.035) 11(2.54,-2.035) 12(2.54,2.035) 13(3.81,-2.035) 14(3.81,2.035)
  silkscreen extent -5.19,-2.13 4.53,1.72, body extent -4.44,-2.82 4.44,3.02, height 5.96
TEST-POINT-0001 [mm] "2024 miniature test point"
  round 1.3 hole 1: 1(0,0)
  body extent -1.27,-1.27 1.27,1.27, height 4.57
WCAP-ATUL_8X11.5(DXL) [mm]
  round 1.308 hole 0.8: 1(1.75,0) 2(-1.75,0)
  silkscreen extent -4.1,-4.1 4.1,4.1

## Part data
3V3 7F 7V 12F 12V 12V M+ M- TP9 VBAT: library part TEST-POINT-0001, "Oranange PC Test Point, Miniature Phoisphor Bronze Silver Plating Through Hole Mounting Type"
7V 12V BUG1 BUG2 DIR1 DIR2 RX TX: library part LED-0001, "LED YELLOW CLEAR 0603 SMD", Forward Current=30mA, Forward Voltage=2V, ComponentLink1Description=Datasheet, ComponentLink1URL=https://www.americanbrightled.com/pdffiles/led-components/smt/BL-HKC36G-AV-TRB.pdf
C1: Package=None, Availability=Unavailable, MF="{'manufacturer': u'W\xfcrth Elektronik'}", MP=860040674004, Price=None
C2 C34 C58 C65 C66 C67 C68: library part "CAP 1210", Capacitance="10 uF", Voltage Rating=50V
C3 C35 C59: library part "CAP 0805", Capacitance=1uF, Voltage Rating=V
C4 C33 C36 C57 C60: library part "CAP 0805", Capacitance="100 nF", Voltage Rating=V
C5 C37 C61: library part "CAP 0805", Capacitance="10 nF", Voltage Rating=V
C6 C9 C26 C38 C62: library part "CAP 0805", Capacitance="1 nF", Voltage Rating=V
C7 C39 C63: library part "CAP 0805", Capacitance="100 pF", Voltage Rating=V
C8 C40 C64: library part "CAP 0805", Capacitance="10 pF", Voltage Rating=V
C10 C13 C18 C25: library part "CAP 0805", Capacitance="1 uF", Voltage Rating=50V
C11 C24: library part "CAP 0805", Capacitance="10 nF", Voltage Rating=50V
C12 C15 C16 C20 C22 C23 C27: library part "CAP 0805", Capacitance="1 nF", Voltage Rating=50V
C14 C17 C19 C21: library part "CAP 0805", Capacitance="100 nF", Voltage Rating=50V
C28 C29: library part "CAP 0805", Capacitance="2.2 uF", Voltage Rating=V
C30 C54: Capacitance="2.7 nF", Voltage Rating=V
C31: library part "CAP 0603", Capacitance="510 nF", Voltage Rating=V
C32 C56: library part "CAP 0603", Capacitance=6.8F, Voltage Rating=V
C41 C42: library part "CAP 0805", Capacitance=100nF, Voltage Rating=16V
C43: Capacitance="10 nF", Voltage Rating=50V
C44 C51: library part "CAP 0805", Capacitance="4.7 uF", Voltage Rating=16V
C45 C47 C73 C74: library part "CAP 0805", Capacitance="1 uF", Voltage Rating=16V
C46 C48 C49 C50 C69 C70: library part "CAP 0805", Capacitance="100 nF", Voltage Rating=16V
C52 C53: Capacitance="2.2 uF", Voltage Rating=V
C55: library part "CAP 0603", Capacitance="3 nF", Voltage Rating=V
C71 C72: library part "CAP 0805", Capacitance="470 pF", Voltage Rating=50V
D1: library part DIO-TVS-0001, "TVS DIODE 40VWM 64.5VC DO214AA", Current Rating=9.3A, Voltage Rating=64.5V, ComponentLink1Description=Datasheet, ComponentLink1URL=https://www.littelfuse.com/media?resourcetype=datasheets&itemid=09a6ae9a-73cb-4ac4-acac-e6dab92ab953&filename=littelfuse_tvs_diode_smbj_datasheet.pdf
D2 D3 D14 D15: library part DIO-TVS-0001, "TVS DIODE 40VWM 64.5VC DO214AA", Current Rating=30.2A, Voltage Rating=12V, ComponentLink1Description=Datasheet, ComponentLink1URL=https://www.littelfuse.com/media?resourcetype=datasheets&itemid=09a6ae9a-73cb-4ac4-acac-e6dab92ab953&filename=littelfuse_tvs_diode_smbj_datasheet.pdf
D5 D6 D7 D8 D9 D10 D12 D13: library part DIO-SCHOTTKY-0003, "DIODE SCHOTTKY 60V 3A SOD128", Current Rating=3A, Reverse Voltage=60V, ComponentLink1Description=Datasheet, ComponentLink1URL=https://assets.nexperia.com/documents/data-sheet/PMEG6030EP.pdf
D16 D22: library part DIO-SCHOTTKY-0001, "DIODE SCHOTTKY 60V 7A POWERDI5", Forward Current=7A, Reverse Voltage (DC)=60V, ComponentLink1Description=Datasheet, ComponentLink1URL=https://www.diodes.com/assets/Datasheets/PDS760.pdf
F1: library part CMP-08604-000021-1, "FUSE BLOK CARTRIDGE 125V 10A SMD", Fuse Current=8A, Voltage Rating=125V, ComponentLink2Description=Datasheet, ComponentLink2URL=https://www.littelfuse.com/~/media/electronics/datasheets/fuses/littelfuse_fuse_154_154t_154l_154tl_datasheet.pdf.pdf
F2: library part FUSE-0001, "FUSE BLOK CARTRIDGE 125V 10A SMD", Fuse Current=8A, Voltage Rating=125V, ComponentLink2Description=Datasheet, ComponentLink2URL=https://www.littelfuse.com/~/media/electronics/datasheets/fuses/littelfuse_fuse_154_154t_154l_154tl_datasheet.pdf.pdf
I1: library part IC_LDO_3V3_0001, "IC REG LIN 3.3V 800MA SOT223-4", ComponentLink1Description="New link", ComponentLink1URL=https://www.ti.com/lit/ds/symlink/lm1117.pdf?HQS=dis-dk-null-digikeymode-dsf-pf-null-wwe&ts=1721700739746
I2: library part IC_LDO_5V_0001, "IC REG LINEAR 5V 800MA SOT223-4", ComponentLink1Description=Datasheet, ComponentLink1URL=https://www.ti.com/lit/ds/symlink/lm1117.pdf?HQS=dis-dk-null-digikeymode-dsf-pf-null-wwe&ts=1721700739746
J1: library part "CONN MF+ 2 PIN Stacked Right Angle", "Micro-Fit+ Right-Angle Header, Through Hole, 3.00mm Pitch, Dual Row, 2 Circuits, 1.52Âµm Matte Tin (Sn) Plating, Glow-Wire Capable, Black", Manufacturer_Name=Molex, Copyright="Copyright (C) 2026 Ultra Librarian. All rights reserved.", Datasheet=https://www.molex.com/en-us/products/part-detail-pdf/2125280200?display=pdf, Manufacturer_Part_Number=2125280200, RefDes=RefDes, Type=Type
J2: library part "CONN MF+ 2 PIN RA HORI", "Micro-Fit+ Right-Angle Header, Through Hole, 3.00mm Pitch, Single Row, 2  Circuits, 0.38Âµm Gold (Au) Plating, Glow-Wire Capable, Black", Manufacturer_Name="Molex Connector Corporation", Copyright="Copyright (C) 2025 Ultra Librarian. All rights reserved.", Manufacturer_Part_Number=2157602002, RefDes=RefDes, Type=Type
J3 J4: library part "CONN MF+ 4 PIN Right Angle Square", "Micro-Fit+ Right-Angle Header, Through Hole, 3.00mm Pitch, Dual Row, 4 Circuits, 1.52Âµm Matte Tin (Sn) Plating, Glow-Wire Capable, Black", Manufacturer_Name="Molex Connector Corporation", Copyright="Copyright (C) 2026 Ultra Librarian. All rights reserved.", Manufacturer_Part_Number=2125280400, RefDes=RefDes, Type=Type
J5: library part CONN_Flashing-0001, "Connector Header Surface Mount 14 position 0.050\" (1.27mm)", Package=None, Availability=Unavailable, ComponentLink1Description=Datasheet, ComponentLink1URL=https://mm.digikey.com/Volume0/opasdata/d220001/medias/docus/6209/ftsh-1xx-xx-xxx-dv-xxx-xxx-x-xx-mkt.pdf, MF=Samtec, MP=FTSH-107-01-L-DV-K, Price=None
J6 J7: library part "CONN MF+ 3 PIN Right Angle", "Micro-Fit+ Right-Angle Header, Through Hole, 3.00mm Pitch, Single Row, 3  Circuits, Matte Tin (Sn) Plating, Glow-Wire Capable, Black", Manufacturer_Name=Molex, Copyright="Copyright (C) 2026 Ultra Librarian. All rights reserved.", Datasheet=https://www.molex.com/en-us/products/part-detail-pdf/2157601003?display=pdf, Manufacturer_Part_Number=2157601003, RefDes=RefDes, Type=Type
L1: library part IND-15U-0002-NoJLC, "SMD MOLDING POWER CHOKE", Current Rating=6A, Inductance=15uH, ComponentLink1Description=Datasheet, ComponentLink1URL=https://www.digikey.com/en/products/detail/codaca/CSAD1010-150M/16633512?s=N4IgjCBcoBwAxVAYygMwIYBsDOBTANCAPZQDaIALHAExwDMEAuoQA4AuUIAymwE4CWAOwDmIAL6Ew1MAE5EIFJAw4CxMiGoy6AdmoUQhajGqa6BjTDp6zhywFY4c23UtOLFbVXPVtYK3e9dODsbdwA2OxgQZhB2Th4BEXFJTQhoBTQsPEISSHITS0do1g5Ibj4hUQkNOBhteTiygFVBfjYAeVQAWVx0bABXXlxzfs4AVoAJcwBbIU4wAMJp9AAPeYDq2hgo9MaQFrbOnr7B4cJRsoBBGbmyuwA6DcIAWmp5RT5%2B1VzyAMYxAFAA
L2: library part IND-10U-0001, "FIXED IND 10UH 6.5A 30 MOHM SMD", Current Rating=6.5A, Inductance=10uH, ComponentLink1Description=Datasheet, ComponentLink1URL=https://productfinder.pulseelectronics.com/api/open/part-attachments/datasheet/BMRF001010401R0MD1
Q1: library part NMOS-60A-0001, "MOSFET N-CH 60V 12A/60A 8VSON", Continuous Current=60A, Voltage=60V, ComponentLink2Description=Datasheet, ComponentLink2URL=http://www.ti.com/lit/ds/symlink/csd18543q3a.pdf
Q2 Q3 Q4 Q5: library part NMOS-26A-0001, "MOSFET N-CH 30V 60A 8VSON", Continuous Current=60A, Voltage=30V, ComponentLink1Description=Datasheet, ComponentLink1URL=https://www.ti.com/lit/ds/symlink/csd17575q3.pdf?ts=1728565072242&ref_url=https%253A%252F%252Fwww.mouser.co.uk%252F
Q6 Q7 Q8 Q9 Q10 Q11: library part NMOS-200MA-0001, "MOSFET N-CH 60V 200MA SOT23", Continuous Current=200mA, Voltage=60V, ComponentLink1Description=Datasheet, ComponentLink1URL=https://toshiba.semicon-storage.com/info/T2N7002AK_datasheet_en_20150401.pdf?did=29712&prodName=T2N7002AK
R1: library part "RES 0805", Resistance=200kΩ, Wattage=100mW
R2 R18 R36: library part "RES 0805", Resistance=100kΩ
  R2: Wattage=100mW
  R18 R36: Wattage=W
R3 R9 R16 R28 R29 R31 R34: library part "RES 0805", Resistance=100Ω, Wattage=1/16W
R4 R15: library part "RES 0805", Resistance=1Ω, Wattage=1/10W
R5 R6 R7 R8 R10 R11 R12 R13: library part "RES 0805", Resistance=33Ω, Wattage=1/8W
R14: Resistance=Ω, Wattage=W
R17 R35: library part "RES 0805", Resistance="2.15 MΩ", Wattage=W
R19 R37: library part "RES 0805", Resistance=178kΩ, Wattage=W
R20: library part "RES 0603", Resistance=59kΩ, Wattage=W
R21 R39: library part "RES 0805", Resistance=1kΩ, Wattage=W
R22 R40: library part "RES 0805", Resistance=240Ω, Wattage=W
R23: library part "RES 0805", Resistance=147kΩ, Wattage=W
R24: library part "RES 0805", Resistance=10.5kΩ, Wattage=W
R25: library part RES-0-0001, "0 Ohms Jumper Chip Resistor 2010 (5025 Metric) Automotive AEC-Q200 Metal Element", Resistance=0Ω, Tolerance=1%, ComponentLink1Description=Datasheet, ComponentLink1URL=https://www.yageo.com/upload/media/product/products/datasheet/rchip/PYu-RC_Group_51_RoHS_L_12.pdf, Size=0402
R26 R27 R30 R33: library part "RES 0805", Resistance=470Ω, Wattage="1/16 W"
R32: library part "RES CAN TERM 1210", Resistance=120Ω, Wattage="1/2 W"
R38: library part "RES 0805", Resistance=36.5kΩ, Wattage=W
R41: library part "RES 0805", Resistance=80.6kΩ, Wattage=W
R42: library part "RES 0805", Resistance=10.4kΩ, Wattage=W
U1 U3: library part IC-MUX-0001, "Multiplexer 1 x 2:1 8-VSSOP", ComponentLink1Description=Datasheet, ComponentLink1URL=https://www.ti.com/general/docs/suppproductinfo.tsp?distId=10&gotoUrl=https%3A%2F%2Fwww.ti.com%2Flit%2Fgpn%2Fsn74lvc2g157
U2 U4: library part IC-GTDR-0001, "IC GATE DRVR HALF-BRIDGE 10VSON", Package=10-VSON, ComponentLink1Description=Datasheet, ComponentLink1URL=https://www.ti.com/lit/ds/symlink/ucc27282.pdf?HQS=dis-dk-null-digikeymode-dsf-pf-null-wwe&ts=1728563165008&ref_url=https%253A%252F%252Fwww.ti.com, VCC Max=16
U5: "-4 to 80V, bidirectional, ultra-precise current sense amplifier with enhanced PWM rejection 8-TSSOP -40 to 125", Manufacturer_Name="Texas Instruments", Copyright="Copyright (C) 2026 Ultra Librarian. All rights reserved.", Manufacturer_Part_Number=INA240A2PWR, RefDes=RefDes, Type=Type
U6 U9: library part IC-BUCK-0001, "IC REG BUCK ADJ 5A 10WSON", ComponentLink1Description=Datasheet, ComponentLink1URL=https://www.ti.com/general/docs/suppproductinfo.tsp?distId=10&gotoUrl=https%3A%2F%2Fwww.ti.com%2Flit%2Fgpn%2Ftps54561
U7: library part IC-STM32G431CBT6, "IC MCU 32BIT 128KB FLASH 48LQFP", Package=48LQFP, ComponentLink1Description=Datasheet, ComponentLink1URL=https://www.st.com/resource/en/datasheet/stm32g431cb.pdf
U8: library part IC-CAN-0001, "IC TRANSCEIVER 1/1 8SOIC", ComponentLink1Description=Datasheet, ComponentLink1URL=https://www.ti.com/lit/ds/symlink/tcan1044-q1.pdf?HQS=dis-dk-null-digikeymode-dsf-pf-null-wwe&ts=1728758303289&ref_url=https%253A%252F%252Fwww.ti.com%252Fgeneral%252Fdocs%252Fsuppproductinfo.tsp%253FdistId%253D10%2526gotoUrl%253Dhttps%253A%252F%252Fwww.ti.com%252Flit%252Fgpn%252Ftcan1044-q1

## Free pads (board coordinates)
  round 250 hole 120: ""(1975,1620) ""(1975,3679.06) ""(4265,3685) ""(5412.01,1620)

## Via types
v1: diameter 20, hole 8, Top Layer to Bottom Layer, 228 vias

## Nets (pads, with @x,y where several pads share a name; then routed paths per layer and width w, separated by ;. In a path a pad name is that pad's centre, name@x,y a point inside that pad or via, vN(x,y) a via of type N, cw(c..) or ccw(c..) an arc to the next point about the centre after c; other vN are vias at no path point)
5V: C65.2 C68.2 C70.2 C72.2 C74.2 I1.3 I2.2 I2.4 J3.1 R21.2 R22.2 R39.2 R40.2 TP9.1 U8.3 | length 4258.1
  Top Layer w10: 3395,2270 3695,2270 3800,2165 3800.71,2165 3880.71,2085 v1(3898.43,2085) ; v1(4740,2165) 5000,2425 5214.76,2425 J3.1@5275.71,2364.06
  Bottom Layer w10: R40.2@1825,1922.4 1867.4,1880 1935,1880 ; R39.2@2167.4,2205 2167.4,2124.8 R21.2@2087.6,2045 2045,2045 1935,1935 1935,1880 ; TP9.1@3085,2255 2765,2255 2495,1985 2495,1835 2450,1790 2250,1790 2117.6,1922.4 R22.2@2060,1922.4 2017.6,1880 1935,1880 ; v1(3898.43,2085) 4075,2085 4145,2015 4555,2015 4705,2165 v1(4740,2165)
7V: 7V.1@2495,2390 C58.2 C59.2 C60.2 C61.2 C62.2 C63.2 C64.2 C66.2 I2.3 L2.2 R41.2 | length 1090.5
  Top Layer w20: R41.2@1860,2287.6 1860,2145 2035,1970 2408.5,1970 2455.5,2017 2455.5,2022 2503.5,2070 L2.2@2508.5,2070 ; 7V.1@2495,2390 2577.68,2307.32 2614.88,2307.32 C58.2@2635,2287.2
12V: 12V.1@3130,3805 12V.1@3140,3055 C34.2 C35.2 C36.2 C37.2 C38.2 C39.2 C40.2 D7.2 D9.2 L1.2 Q2.3 Q4.3 R4.2 R15.2 R23.2 | length 4482
  Top Layer w10: Q2.3@5027.2,3400.31 5054.69,3400.31 v1(5055,3400)
  Top Layer w20: 12V.1@3130,3805 3220,3895 3625,3895 3785,3735 ; 12V.1@3140,3055 3145,3060 3250,3060 ; 3335,3265 3250,3180 3250,3060 ; 4155,3445 v1(4565,3445) ; R4.2@4930,2552.6 4930,2485 4862.6,2417.6 4060,2417.6 R15.2@4020,2457.6 3872.4,2310 3605,2310 3540,2375 3540,2820 3437.5,2922.5 3387.5,2922.5 3250,3060
  Bottom Layer w20: v1(4565,3445) 4857.29,3445 4867.29,3435 v1(4870,3435) v1(4900,3435) 4965,3435 v1(5000,3400) v1(5055,3400)